# EAGLE board tinkercad (EAGLE 9.7.0)

Size 206.31 x 65.65 mm. Coordinates in mm from the lower left corner, seen from the top.
Outline: 0,0 206.31,0 206.31,65.65 0,65.65 0,0
Copper layers (1*16): Top 0.035mm / dielectric 1.5mm / Bottom 0.035mm
Design rules "default": minimum track width 6mil, minimum drill 0.35mm, track to track 6mil, track to pad 6mil, pad to pad 6mil, via to via 6mil, smd to smd 6mil, copper to edge 40mil, drill to drill 6mil, minimum pad ring 10mil, minimum via ring 8mil, stop-mask expansion 4mil, vias tented up to drill 0mil, thermal gap 10mil

## Footprints (pad centres in the part's own frame; a part is rotated, then mirrored left to right if it is on the bottom)
BATTERY-GENERIC = drill 1.118 pad 3.15 octagon: + 2.54,0; - -2.54,0
CAP-THRU-2.54MM = drill 1.016 pad 1.88: 1 -1.27,0; 2 1.27,0
LEDRD254W60D565H860B = drill 0.981 pad 1.581: 1 -1.27,0; 2 1.27,0
RESAD1016W63L850D250B = drill 0.83 pad 1.43: 1 -5.08,0; 2 5.08,0
HA-06-SM065 = drill 1 pad 1.676: 1 -2.54,-2.54; 2 0,2.54; 3 2.54,-2.54
SWITCH-MOMENTARY-PTH-6.5MM = drill 1.016 pad 1.88: 1 -3.251,2.261; 2 3.251,2.261; 3 -3.251,-2.261; 4 3.251,-2.261
TO220V = drill 1.016 long: 1 -2.54,-2.54; 2 0,-2.54; 3 2.54,-2.54
DIP826W53P254L959H508Q8B = drill 0.786 pad 1.386: 1 -4.13,3.81; 2 -4.13,1.27; 3 -4.13,-1.27; 4 -4.13,-3.81; 5 4.13,-3.81; 6 4.13,-1.27; 7 4.13,1.27; 8 4.13,3.81

## Placement (x,y rotation side)
BAT1  9V  [BATTERY-GENERIC]  8.26,17.2 90 top
C1  10n  [CAP-THRU-2.54MM]  156.15,28.23 0 top
D1  RED  [LEDRD254W60D565H860B]  57.09,7.91 0 top
D2  RED  [LEDRD254W60D565H860B]  194.25,10.45 180 top
D3  RED  [LEDRD254W60D565H860B]  165.54,57.74 180 top
R1  330  [RESAD1016W63L850D250B]  55.82,18.07 90 top
R2  330  [RESAD1016W63L850D250B]  195.52,20.61 90 top
R3  1k  [RESAD1016W63L850D250B]  129.48,30.77 90 top
RPOT1  100k  [HA-06-SM065]  139.77,55.12 0 top
S1  SWITCH_MOMENTARY  [SWITCH-MOMENTARY-PTH-6.5MM]  58.36,29.5 90 top
S2  SWITCH_MOMENTARY  [SWITCH-MOMENTARY-PTH-6.5MM]  198.06,29.5 90 top
U1  LM7805_TO220V  [TO220V]  19.94,52.06 0 top
U2  LM555_DIP  [DIP826W53P254L959H508Q8B]  130.75,19.34 90 top

## Library data of the parts
BAT1 C1 R1-R3 RPOT1 S1 S2 U1 = Tinkercad
D1-D3 = Tinkercad; CATEGORY: Opto-Electronic; SUB-CATEGORY: LED; VALUE: LED_RED
U2 = Tinkercad; CATEGORY: IC_Clock-Timing; CURRENT-SUPPLY: 10mA; DESCRIPTION: IC OSC SINGLE TIMER 100KHZ 8-DIP; FREQUENCY: 100kHz; MANUFACTURER: Texas Instruments; MPN: LM555CN/NOPB; OPERATING_TEMP: 0°C to 70°C; PART_STATUS: Active; ROHS_COMPLIANT: ROHS3 Compliant; SUB-CATEGORY: Timer

## Nets
BAT1+: BAT1.+ U1.1
BAT1-: BAT1.- C1.2 D1.2 D2.2 D3.2 RPOT1.3 U1.2 U2.1
D1_A: D1.1 R1.1
D2_A: D2.1 R2.1
RPOT1_P$1: R3.2 RPOT1.1
S1_2: R1.2 S1.1 S1.2
S2_2: R2.2 S2.1 S2.2
U2_DIS: R3.1 U2.7
U2_OUT: D3.1 S1.3 S1.4 S2.3 S2.4 U2.3
U2_TR: C1.1 RPOT1.2 U2.2 U2.5 U2.6
U2_V+: U1.3 U2.4 U2.8

## Tracks (layer width: path | path; a pad name or v marks a point on that pad's centre or on a via)
BAT1+  (1 unrouted)
BAT1-  (7 unrouted)
D1_A  (1 unrouted)
D2_A  (1 unrouted)
RPOT1_P$1  (1 unrouted)
S1_2  (2 unrouted)
S2_2  (2 unrouted)
U2_DIS  (1 unrouted)
U2_OUT  (5 unrouted)
U2_TR  (4 unrouted)
U2_V+  (2 unrouted)